# Altium PCB DSP_Expansion_Board.PcbDoc (part 3 of 3)
Units mil, origin at the board's own origin, x right, y up, seen from the top; angles counter-clockwise.
Board outline 7913.39 x 4448.82 mil, 4 copper layers (Top Layer, GND, inner signal, Bottom Layer), stack 23.78 mil thick; 392 components, 294 nets, 1167 pads, 457 vias.
Unrouted connection lines stored in the file: 108.
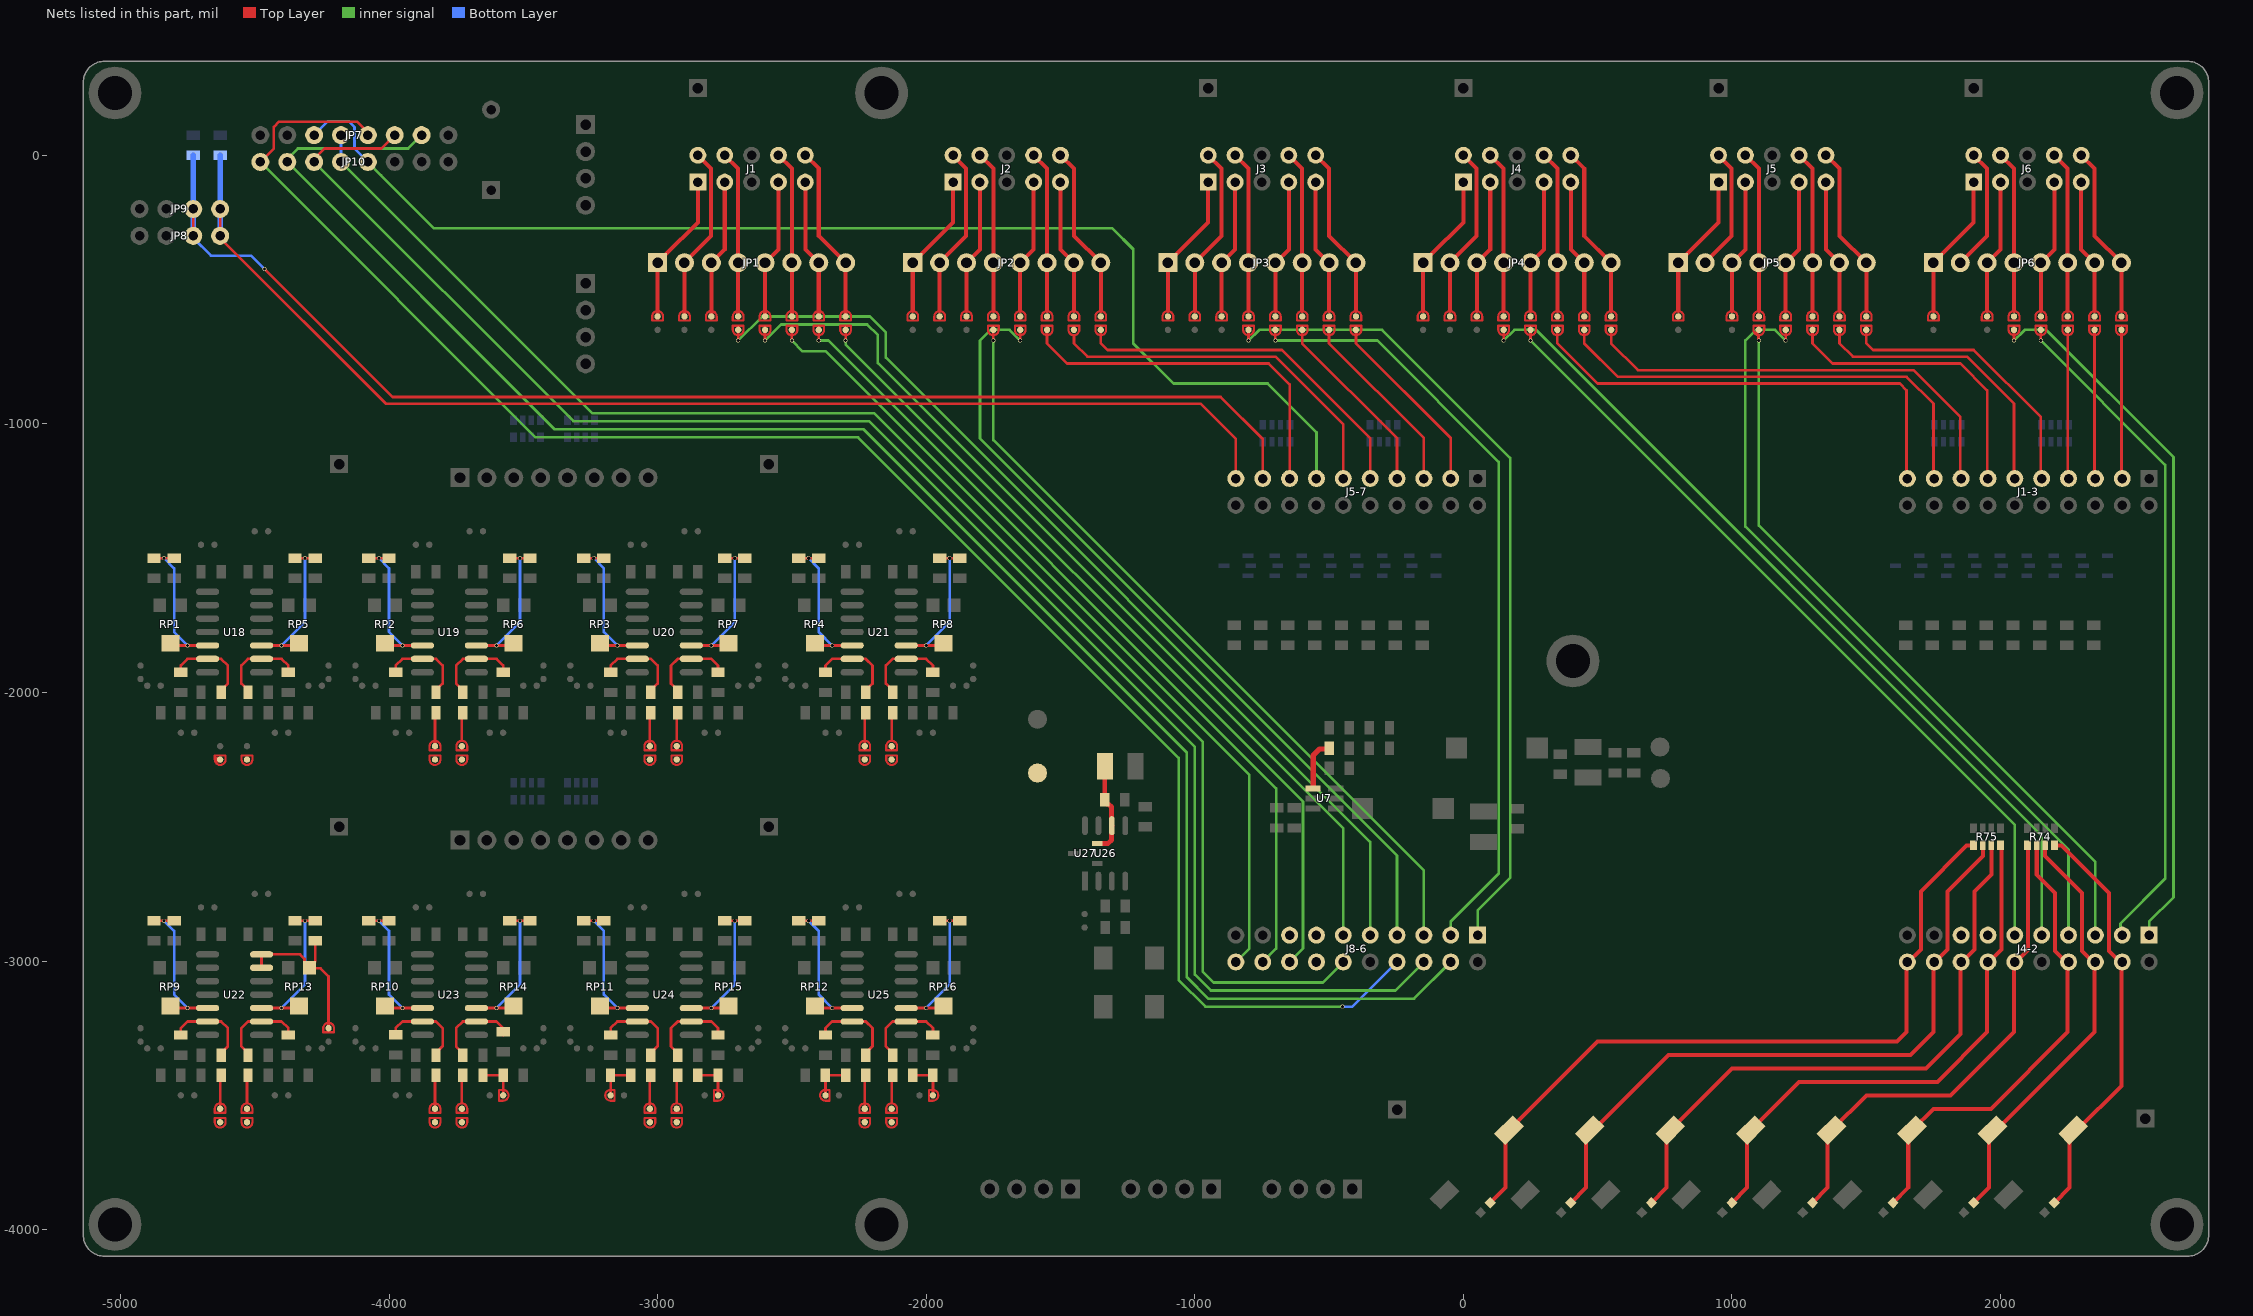
[diagram p5: the nets of this part, all layers, seen from the top]

## Via types
v1: diameter 15, hole 12, Top Layer to Bottom Layer, 457 vias

## Nets (pads, with @x,y where several pads share a name; then routed paths per layer and width w, separated by ;. In a path a pad name is that pad's centre, name@x,y a point inside that pad or via, vN(x,y) a via of type N, cw(c..) or ccw(c..) an arc to the next point about the centre after c; other vN are vias at no path point) (continued)
NetDE92_2: DE92.2 R59.2 R67.1 | length 150.2
  Top Layer w10: R67.1@-3650.2,-3425 R59.2@-3575,-3425 -3575,-3480 DE92.2@-3575,-3500
NetDE93_2: DE93.2 R60.2 R68.1 | length 150
  Top Layer w10: DE93.2@-3175,-3500 -3175,-3480 -3175,-3425 R68.1@-3100,-3425
NetDE94_2: DE94.2 R61.2 R69.1 | length 150.2
  Top Layer w10: R69.1@-2850.2,-3425 R61.2@-2775,-3425 -2775,-3480 DE94.2@-2775,-3500
NetDE95_2: DE95.2 R62.2 R70.1 | length 150
  Top Layer w10: DE95.2@-2375,-3500 -2375,-3480 -2375,-3425 R70.1@-2300,-3425
NetDE96_2: DE96.2 R63.2 R71.1 | length 150
  Top Layer w10: R71.1@-2050,-3425 R63.2@-1975,-3425 -1975,-3480 DE96.2@-1975,-3500
NetDE113_2: DE113.2 R99.2 RP13.1 U22.13 U22.14 | length 639.2
  Top Layer w10: U22.13@-4474.53,-3025 U22.14@-4474.53,-2975 -4331.6,-2975 -4314.79,-2991.81 -4314.79,-3006.47 -4294.25,-3027.01 -4254.79,-3027.01 -4225,-3056.8 -4225,-3230 DE113.2@-4225,-3250 ; RP13.1@-4294.25,-3021.02 -4275,-3001.77 R99.2@-4275,-2925
NetDE114_2: DE114.2 R34.2 | length 121.5
  Top Layer w10: DE114.2@-3828.74,-2200 R34.2@-3828.74,-2078.54
NetDE115_1: DE115.1 R35.2 | length 101.3
  Top Layer w10: -3728.74,-2180 R35.2@-3728.74,-2078.74
NetDE116_2: DE116.2 R36.2 | length 121.5
  Top Layer w10: DE116.2@-3028.74,-2200 R36.2@-3028.74,-2078.54
NetDE117_1: DE117.1 R37.2 | length 101.3
  Top Layer w10: -2928.74,-2180 R37.2@-2928.74,-2078.74
NetDE118_2: DE118.2 R38.2 | length 121.5
  Top Layer w10: DE118.2@-2228.74,-2200 R38.2@-2228.74,-2078.54
NetDE119_1: DE119.1 R39.2 | length 101.3
  Top Layer w10: -2128.74,-2180 R39.2@-2128.74,-2078.74
NetDE120_2: DE120.2 R64.2 | length 121.5
  Top Layer w10: DE120.2@-4628.74,-3550 R64.2@-4628.74,-3428.54
NetDE121_1: DE121.1 R65.2 | length 101.3
  Top Layer w10: -4528.74,-3530 R65.2@-4528.74,-3428.74
NetDE122_2: DE122.2 R66.2 | length 121.5
  Top Layer w10: DE122.2@-3828.74,-3550 R66.2@-3828.74,-3428.54
NetDE123_1: DE123.1 R67.2 | length 101.3
  Top Layer w10: -3728.74,-3530 R67.2@-3728.74,-3428.74
NetDE124_2: DE124.2 R68.2 | length 121.5
  Top Layer w10: DE124.2@-3028.74,-3550 R68.2@-3028.74,-3428.54
NetDE125_1: DE125.1 R69.2 | length 101.3
  Top Layer w10: -2928.74,-3530 R69.2@-2928.74,-3428.74
NetDE126_2: DE126.2 R70.2 | length 121.5
  Top Layer w10: DE126.2@-2228.74,-3550 R70.2@-2228.74,-3428.54
NetDE127_1: DE127.1 R71.2 | length 101.3
  Top Layer w10: -2128.74,-3530 R71.2@-2128.74,-3428.74
NetR2_1: R2.1 U7.1 | length 193.9
  Top Layer w20: U7.1@-559.65,-2357.28 -559.65,-2234.65 -535.59,-2210.59 -503.3,-2210.59 R2.1@-499.8,-2207.09
NetR8_1: R8.1 R16.1 U18.6 | length 331.3
  Top Layer w10: R16.1@-4775,-1925.2 -4775,-1900 -4750,-1875 U18.6@-4675.47,-1875 -4625,-1875 -4600,-1900 -4600,-1967.3 -4625.2,-1992.5 R8.1@-4625.2,-2000
NetR9_1: R9.1 R17.1 U18.9 | length 331.3
  Top Layer w10: R9.1@-4525,-2000 -4525,-1992.5 -4550,-1967.5 -4550,-1900 -4525,-1875 U18.9@-4474.53,-1875 -4400,-1875 -4375,-1900 R17.1@-4375,-1925.2
NetR10_1: R10.1 R18.1 U19.6 | length 331.3
  Top Layer w10: R18.1@-3975,-1925.2 -3975,-1900 -3950,-1875 U19.6@-3875.47,-1875 -3825,-1875 -3800,-1900 -3800,-1967.3 -3825.2,-1992.5 R10.1@-3825.2,-2000
NetR11_1: R11.1 R19.1 U19.9 | length 331.3
  Top Layer w10: R11.1@-3725,-2000 -3725,-1992.5 -3750,-1967.5 -3750,-1900 -3725,-1875 U19.9@-3674.53,-1875 -3600,-1875 -3575,-1900 R19.1@-3575,-1925.2
NetR12_1: R12.1 R20.1 U20.6 | length 331.3
  Top Layer w10: R20.1@-3175,-1925.2 -3175,-1900 -3150,-1875 U20.6@-3075.47,-1875 -3025,-1875 -3000,-1900 -3000,-1967.3 -3025.2,-1992.5 R12.1@-3025.2,-2000
NetR13_1: R13.1 R21.1 U20.9 | length 331.3
  Top Layer w10: R13.1@-2925,-2000 -2925,-1992.5 -2950,-1967.5 -2950,-1900 -2925,-1875 U20.9@-2874.53,-1875 -2800,-1875 -2775,-1900 R21.1@-2775,-1925.2
NetR14_1: R14.1 R22.1 U21.6 | length 331.3
  Top Layer w10: R22.1@-2375,-1925.2 -2375,-1900 -2350,-1875 U21.6@-2275.47,-1875 -2225,-1875 -2200,-1900 -2200,-1967.3 -2225.2,-1992.5 R14.1@-2225.2,-2000
NetR15_1: R15.1 R23.1 U21.9 | length 331.3
  Top Layer w10: R15.1@-2125,-2000 -2125,-1992.5 -2150,-1967.5 -2150,-1900 -2125,-1875 U21.9@-2074.53,-1875 -2000,-1875 -1975,-1900 R23.1@-1975,-1925.2
NetR40_1: R40.1 R48.1 U22.6 | length 331.3
  Top Layer w10: R48.1@-4775,-3275.2 -4775,-3250 -4750,-3225 U22.6@-4675.47,-3225 -4625,-3225 -4600,-3250 -4600,-3317.3 -4625.2,-3342.5 R40.1@-4625.2,-3350
NetR41_1: R41.1 R49.1 U22.9 | length 331.3
  Top Layer w10: R41.1@-4525,-3350 -4525,-3342.5 -4550,-3317.5 -4550,-3250 -4525,-3225 U22.9@-4474.53,-3225 -4400,-3225 -4375,-3250 R49.1@-4375,-3275.2
NetR42_1: R42.1 R50.1 U23.6 | length 331.3
  Top Layer w10: R50.1@-3975,-3275.2 -3975,-3250 -3950,-3225 U23.6@-3875.47,-3225 -3825,-3225 -3800,-3250 -3800,-3317.3 -3825.2,-3342.5 R42.1@-3825.2,-3350
NetR43_1: R43.1 R51.1 U23.9 | length 331.3
  Top Layer w10: R43.1@-3725,-3350 -3725,-3342.5 -3750,-3317.5 -3750,-3250 -3725,-3225 U23.9@-3674.53,-3225 -3600,-3225 -3575,-3250 R51.1@-3575,-3275.2
NetR44_1: R44.1 R52.1 U24.6 | length 331.3
  Top Layer w10: R52.1@-3175,-3275.2 -3175,-3250 -3150,-3225 U24.6@-3075.47,-3225 -3025,-3225 -3000,-3250 -3000,-3317.3 -3025.2,-3342.5 R44.1@-3025.2,-3350
NetR45_1: R45.1 R53.1 U24.9 | length 331.3
  Top Layer w10: R45.1@-2925,-3350 -2925,-3342.5 -2950,-3317.5 -2950,-3250 -2925,-3225 U24.9@-2874.53,-3225 -2800,-3225 -2775,-3250 R53.1@-2775,-3275.2
NetR46_1: R46.1 R54.1 U25.6 | length 331.3
  Top Layer w10: R54.1@-2375,-3275.2 -2375,-3250 -2350,-3225 U25.6@-2275.47,-3225 -2225,-3225 -2200,-3250 -2200,-3317.3 -2225.2,-3342.5 R46.1@-2225.2,-3350
NetR47_1: R47.1 R55.1 U25.9 | length 331.3
  Top Layer w10: R47.1@-2125,-3350 -2125,-3342.5 -2150,-3317.5 -2150,-3250 -2125,-3225 U25.9@-2074.53,-3225 -2000,-3225 -1975,-3250 R55.1@-1975,-3275.2
NetR80_1: R80.1 R81.2 RP1.2 U18.5 | length 578.4
  Top Layer w10: R80.1@-4875,-1500.2 v1(-4837.5,-1500.2) R81.2@-4800,-1500.2 ; RP1.2@-4814.37,-1816.73 -4806.1,-1825 U18.5@-4675.47,-1825
  Bottom Layer w10: v1(-4837.5,-1500.2) -4800,-1537.7 -4800,-1775 v1(-4750,-1825)
NetR82_2: R82.2 R83.1 RP5.2 U18.10 | length 578.4
  Top Layer w10: U18.10@-4474.53,-1825 -4343.9,-1825 RP5.2@-4335.63,-1816.73 ; R82.2@-4350,-1500.2 v1(-4312.5,-1500.2) R83.1@-4275,-1500.2
  Bottom Layer w10: v1(-4400,-1825) -4312.5,-1737.5 v1(-4312.5,-1500.2)
NetR84_1: R84.1 R85.2 RP2.2 U19.5 | length 578.4
  Top Layer w10: R84.1@-4075,-1500.2 v1(-4037.5,-1500.2) R85.2@-4000,-1500.2 ; RP2.2@-4014.37,-1816.73 -4006.1,-1825 U19.5@-3875.47,-1825
  Bottom Layer w10: v1(-4037.5,-1500.2) -4000,-1537.7 -4000,-1775 v1(-3950,-1825)
NetR86_2: R86.2 R87.1 RP6.2 U19.10 | length 578.4
  Top Layer w10: U19.10@-3674.53,-1825 -3543.9,-1825 RP6.2@-3535.63,-1816.73 ; R86.2@-3550,-1500.2 v1(-3512.5,-1500.2) R87.1@-3475,-1500.2
  Bottom Layer w10: v1(-3600,-1825) -3512.5,-1737.5 v1(-3512.5,-1500.2)
NetR88_1: R88.1 R89.2 RP3.2 U20.5 | length 578.4
  Top Layer w10: R88.1@-3275,-1500.2 v1(-3237.5,-1500.2) R89.2@-3200,-1500.2 ; RP3.2@-3214.37,-1816.73 -3206.1,-1825 U20.5@-3075.47,-1825
  Bottom Layer w10: v1(-3237.5,-1500.2) -3200,-1537.7 -3200,-1775 v1(-3150,-1825)
NetR90_2: R90.2 R91.1 RP7.2 U20.10 | length 578.4
  Top Layer w10: U20.10@-2874.53,-1825 -2743.9,-1825 RP7.2@-2735.63,-1816.73 ; R90.2@-2750,-1500.2 v1(-2712.5,-1500.2) R91.1@-2675,-1500.2
  Bottom Layer w10: v1(-2800,-1825) -2712.5,-1737.5 v1(-2712.5,-1500.2)
NetR92_1: R92.1 R93.2 RP4.2 U21.5 | length 578.4
  Top Layer w10: R92.1@-2475,-1500.2 v1(-2437.5,-1500.2) R93.2@-2400,-1500.2 ; RP4.2@-2414.37,-1816.73 -2406.1,-1825 U21.5@-2275.47,-1825
  Bottom Layer w10: v1(-2437.5,-1500.2) -2400,-1537.7 -2400,-1775 v1(-2350,-1825)
NetR94_2: R94.2 R95.1 RP8.2 U21.10 | length 578.4
  Top Layer w10: U21.10@-2074.53,-1825 -1943.9,-1825 RP8.2@-1935.63,-1816.73 ; R94.2@-1950,-1500.2 v1(-1912.5,-1500.2) R95.1@-1875,-1500.2
  Bottom Layer w10: v1(-2000,-1825) -1912.5,-1737.5 v1(-1912.5,-1500.2)
NetR96_1: R96.1 R97.2 RP9.2 U22.5 | length 578.4
  Top Layer w10: R96.1@-4875,-2850.2 v1(-4837.5,-2850.2) R97.2@-4800,-2850.2 ; RP9.2@-4814.37,-3166.73 -4806.1,-3175 v1(-4750,-3175) U22.5@-4675.47,-3175
  Bottom Layer w10: v1(-4837.5,-2850.2) -4800,-2887.7 -4800,-3125 v1(-4750,-3175)
NetR98_2: R98.2 R99.1 RP13.2 U22.10 | length 578.4
  Top Layer w10: U22.10@-4474.53,-3175 -4343.9,-3175 RP13.2@-4335.63,-3166.73 ; R98.2@-4350,-2850.2 v1(-4312.5,-2850.2) R99.1@-4275,-2850.2
  Bottom Layer w10: v1(-4400,-3175) -4312.5,-3087.5 v1(-4312.5,-2850.2)
NetR100_1: R100.1 R101.2 RP10.2 U23.5 | length 578.4
  Top Layer w10: R100.1@-4075,-2850.2 v1(-4037.5,-2850.2) R101.2@-4000,-2850.2 ; RP10.2@-4014.37,-3166.73 -4006.1,-3175 U23.5@-3875.47,-3175
  Bottom Layer w10: v1(-4037.5,-2850.2) -4000,-2887.7 -4000,-3125 v1(-3950,-3175)
NetR102_2: R102.2 R103.1 RP14.2 U23.10 | length 578.4
  Top Layer w10: U23.10@-3674.53,-3175 -3543.9,-3175 RP14.2@-3535.63,-3166.73 ; R102.2@-3550,-2850.2 v1(-3512.5,-2850.2) R103.1@-3475,-2850.2
  Bottom Layer w10: v1(-3600,-3175) -3512.5,-3087.5 v1(-3512.5,-2850.2)
NetR104_1: R104.1 R105.2 RP11.2 U24.5 | length 578.4
  Top Layer w10: R104.1@-3275,-2850.2 v1(-3237.5,-2850.2) R105.2@-3200,-2850.2 ; RP11.2@-3214.37,-3166.73 -3206.1,-3175 U24.5@-3075.47,-3175
  Bottom Layer w10: v1(-3237.5,-2850.2) -3200,-2887.7 -3200,-3125 v1(-3150,-3175)
NetR106_2: R106.2 R107.1 RP15.2 U24.10 | length 578.4
  Top Layer w10: U24.10@-2874.53,-3175 -2743.9,-3175 RP15.2@-2735.63,-3166.73 ; R106.2@-2750,-2850.2 v1(-2712.5,-2850.2) R107.1@-2675,-2850.2
  Bottom Layer w10: v1(-2800,-3175) -2712.5,-3087.5 v1(-2712.5,-2850.2)
NetR108_1: R108.1 R109.2 RP12.2 U25.5 | length 578.4
  Top Layer w10: R108.1@-2475,-2850.2 v1(-2437.5,-2850.2) R109.2@-2400,-2850.2 ; RP12.2@-2414.37,-3166.73 -2406.1,-3175 U25.5@-2275.47,-3175
  Bottom Layer w10: v1(-2437.5,-2850.2) -2400,-2887.7 -2400,-3125 v1(-2350,-3175)
NetR110_2: R110.2 R111.1 RP16.2 U25.10 | length 578.4
  Top Layer w10: U25.10@-2074.53,-3175 v1(-2000,-3175) -1943.9,-3175 RP16.2@-1935.63,-3166.73 ; R110.2@-1950,-2850.2 v1(-1912.5,-2850.2) R111.1@-1875,-2850.2
  Bottom Layer w10: v1(-2000,-3175) -1912.5,-3087.5 v1(-1912.5,-2850.2)
P0: DE24.1 J4-2.1 | length 2663.8
  Top Layer w10: v1(2050,-690) 2050,-670 DE24.1@2050,-650
  inner signal w10: v1(2050,-690) 2090,-650 2170,-650 2643.62,-1123.62 2643.62,-2762.93 2553,-2853.54 J4-2.1@2553,-2903.54
P1: DE30.1 J4-2.3 | length 2517.2
  Top Layer w10: v1(2150,-690) 2150,-670 DE30.1@2150,-650
  inner signal w10: v1(2150,-690) 2613,-1153 2613,-2693.54 2446.26,-2860.29 2446.26,-2896.8 J4-2.3@2453,-2903.54
P2: DE23.1 J4-2.5 | length 2766.7
  Top Layer w10: 1090,-660 1099.04,-669.04 1099.04,-669.98 1099.04,-689.04 v1(1100,-690)
  inner signal w10: v1(1100,-690) 1100,-1378.74 2353,-2631.74 J4-2.5@2353,-2903.54
P3: DE29.1 J4-2.7 | length 2935
  Top Layer w10: v1(1200,-690) 1200,-670 DE29.1@1200,-650
  inner signal w10: v1(1200,-690) 1160,-650 1090,-650 1050,-690 1050,-1382.02 2253,-2585.03 J4-2.7@2253,-2903.54
P4: DE22.1 J4-2.9 | length 3210.8
  Top Layer w10: v1(150,-690) 150,-670 DE22.1@150,-650
  inner signal w10: v1(150,-690) 190,-650 271.26,-650 2153,-2531.74 J4-2.9@2153,-2903.54
P5: DE28.1 J4-2.11 | length 3000.4
  Top Layer w10: v1(250,-690) 250,-670 DE28.1@250,-650
  inner signal w10: v1(250,-690) 2053,-2493 J4-2.11@2053,-2903.54
P6: DE21.1 J8-6.1 | length 3055.5
  Top Layer w10: v1(-800,-690) -800,-670 DE21.1@-800,-650
  inner signal w10: v1(-800,-690) -760,-650 -302.33,-650 174.36,-1126.68 174.36,-2690.07 53,-2811.42 J8-6.1@53,-2903.54
P7: DE27.1 J8-6.3 | length 2894.2
  Top Layer w10: v1(-700,-690) -700,-670 DE27.1@-700,-650
  inner signal w10: v1(-700,-690) -320.54,-690 131.54,-1142.08 131.54,-2675.01 -47,-2853.54 J8-6.3@-47,-2903.54
P8: DE20.1 J8-6.5 | length 2917.5
  Top Layer w10: v1(-1750,-690) -1750,-670 DE20.1@-1750,-650
  inner signal w10: v1(-1750,-690) -1750,-1060.54 -147,-2663.54 J8-6.5@-147,-2903.54
P9: DE26.1 J8-6.7 | length 3080
  Top Layer w10: v1(-1650,-690) -1650,-670 DE26.1@-1650,-650
  inner signal w10: v1(-1650,-690) -1690,-650 -1760,-650 -1800,-690 -1800,-1053.74 -247,-2606.74 J8-6.7@-247,-2903.54
P10: DE19.1 J8-6.9 | length 3642.5
  Top Layer w10: v1(-2700,-690) -2700,-670 DE19.1@-2700,-650
  inner signal w10: v1(-2700,-690) -2610,-600 -2210,-600 -2150,-660 -2150,-753.74 -347,-2556.74 J8-6.9@-347,-2903.54
P11: DE25.1 J8-6.11 | length 3452.8
  Top Layer w10: v1(-2600,-690) -2600,-670 DE25.1@-2600,-650
  inner signal w10: v1(-2600,-690) -2540,-630 -2220,-630 -2180,-670 -2180,-773.74 -447,-2506.74 J8-6.11@-447,-2903.54
P14: J8-6.13
P15: J8-6.15
P16: J4-2.15
P18: DE36.1 J1-3.7 | length 554.8
  Top Layer w10: DE36.1@2250,-650 2250,-670 2250,-1200.54 J1-3.7@2253,-1203.54
P19: DE42.1 J1-3.5 | length 554.8
  Top Layer w10: DE42.1@2350,-650 2350,-670 2350,-1200.54 J1-3.5@2353,-1203.54
P22: DE46.1 J1-3.15 | length 1693.7
  Top Layer w10: DE46.1@550,-650 550,-670 550,-700 650,-800 1675,-800 1850,-975 1850,-1200.54 J1-3.15@1853,-1203.54
P24: J4-2.13
P25: DE31.1 J8-6.20 | length 3130.2
  Top Layer w10: v1(-2500,-690) -2500,-670 DE31.1@-2500,-650
  inner signal w10: v1(-2500,-690) -2460,-730 -2373.74,-730 -797,-2306.74 -797,-2953.54 J8-6.20@-847,-3003.54
P26: DE43.1 J8-6.16 | length 3079.7
  Top Layer w10: v1(-2300,-689.37) -2300,-670 DE43.1@-2300,-650
  inner signal w10: v1(-2300,-689.37) -2300,-703.74 -597,-2406.74 -597,-2953.54 J8-6.16@-647,-3003.54
P27: DE37.1 J8-6.18 | length 3100.9
  Top Layer w10: v1(-2400,-690) -2400,-670 DE37.1@-2400,-650
  inner signal w10: v1(-2400,-690) -2363.82,-690 -697,-2356.83 -697,-2953.54 J8-6.18@-747,-3003.54
P29: C18.1 J4-2.20 R75.5 SW1.1 | length 2744
  Top Layer w15: C18.1@100,-3900 156.29,-3843.71 156.29,-3643.71 SW1.1@170.21,-3629.79 500,-3300 1614.42,-3300 1650,-3264.42 1650,-3050 1650,-3010.04 1703,-2957.03 1703,-2740.3 1872.7,-2570.6 1896.92,-2570.6 R75.5@1899.21,-2568.3
P32: DE48.1 J1-3.3 | length 554.8
  Top Layer w10: DE48.1@2450,-650 2450,-670 2450,-1200.54 J1-3.3@2453,-1203.54
P40: J5-7.19 JP8.4 JP9.4 R73.1 | length 4649.2
  Top Layer w10: JP9.4@-4628.74,-200 -4628.74,-308.41 -4012.15,-925 -978.74,-925 -847,-1056.74 J5-7.19@-847,-1205.79
  Bottom Layer w20: JP8.4@-4628.74,-300 JP9.4@-4628.74,-200 R73.1@-4628.74,0
P41: J5-7.17 JP8.3 JP9.3 R72.1 | length 4864
  Top Layer w10: JP8.3@-4728.74,-308.41 JP9.3@-4728.74,-200 ; v1(-4463.33,-423.82) -3987.15,-900 -903.74,-900 -747,-1056.74 J5-7.17@-747,-1212.21
  Bottom Layer w10: JP8.3@-4728.74,-300 -4728.74,-308.41 -4663.33,-373.82 -4513.33,-373.82 v1(-4463.33,-423.82)
  Bottom Layer w20: JP8.3@-4728.74,-300 JP9.3@-4728.74,-200 R72.1@-4728.74,0
P52: DE32.1 J5-7.15 | length 1373.6
  Top Layer w10: DE32.1@-1550,-650 -1550,-670 -1550,-700 -1475,-775 -725,-775 -647,-853 J5-7.15@-647,-1210.18
P56: DE33.1 J5-7.7 | length 700.4
  Top Layer w10: DE33.1@-600,-650 -600,-670 -600,-700 -247,-1053 J5-7.7@-247,-1204.22
P58: C17.1 J4-2.12 R74.5 SW5.1 | length 1829.2
  Top Layer w15: C17.1@1300,-3900 1356.29,-3843.71 SW5.1@1356.29,-3643.71 ; SW5.1@1370.21,-3629.79 1500,-3500 1814.42,-3500 2050,-3264.42 2050,-3050 2050,-3010.04 2102,-2958.04 2102,-2570.3 R74.5@2100,-2568.3
P59: C12.1 J4-2.14 R75.8 SW4.1 | length 2030.1
  Top Layer w15: C12.1@1000,-3900 1056.29,-3843.71 SW4.1@1056.29,-3643.71 ; SW4.1@1070.21,-3629.79 1250,-3450 1764.42,-3450 1950,-3264.42 1950,-3050 1950,-3010.04 2003,-2957.03 2003,-2571.3 R75.8@2000,-2568.3
P60: DE35.1 J1-3.13 | length 1102.3
  Top Layer w10: DE35.1@1300,-650 1300,-670 1300,-700 1375,-775 1850,-775 1950,-875 1950,-1200.54 J1-3.13@1953,-1203.54
P61: C11.1 J4-2.4 R74.8 SW8.1 | length 1541.4
  Top Layer w15: C11.1@2200,-3900 2256.29,-3843.71 SW8.1@2256.29,-3643.71 ; R74.8@2200.79,-2568.3 2203.08,-2570.6 2227.3,-2570.6 2403,-2746.3 2403,-2963.04 2450,-3010.04 2450,-3464.42 2284.63,-3629.79 SW8.1@2270.21,-3629.79
P63: J8-6.12 JP7.4 JP10.4 | length 5630.4
  inner signal w10: JP10.4@-4178.74,-25 -3243.74,-960 -2193.74,-960 -970,-2183.74 -970,-3040 -930,-3080 -523.45,-3080 J8-6.12@-447,-3003.54
  Bottom Layer w10: JP10.4@-4178.74,-25 JP7.4@-4178.74,75
P64: J8-6.14
P65: J5-7.13 JP7.3 JP10.5 | length 4655.5
  inner signal w10: JP10.5@-4078.74,-25 -4078.74,-25.3 -4029.04,-75 -3831.94,-272.1 -1306.94,-272.1 -1229.04,-350 -1229.04,-700 -1079.04,-850 -728.74,-850 -547,-1031.74 J5-7.13@-547,-1203.54
  Bottom Layer w10: JP7.3@-4278.74,75 -4228.74,125 -4148.74,125 -4128.74,105 -4128.74,25 JP10.5@-4078.74,-25
P66: J8-6.4 JP7.7 JP10.2 | length 6726.1
  inner signal w10: JP7.7@-3878.74,85 JP7.7@-3878.74,75 -3928.74,25 -4339.52,25 -4378.74,-14.22 JP10.2@-4378.74,-25 -3383.74,-1020 -2233.74,-1020 -1030,-2223.74 -1030,-3060 -950,-3140 -183.45,-3140 J8-6.4@-47,-3003.54
P67: DE47.1 J1-3.9 | length 1043.7
  Top Layer w10: DE47.1@1500,-650 1500,-670 1500,-700 1525,-725 1900,-725 2150,-975 2150,-1200.54 J1-3.9@2153,-1203.54
P94: DE38.1 J5-7.11 | length 1354.8
  Top Layer w10: -1450,-674.25 -1450,-700 -1400,-750 -700,-750 -447,-1003 J5-7.11@-447,-1203.54
P95: DE45.1 J5-7.3 | length 700.4
  Top Layer w10: DE45.1@-400,-650 -400,-670 -400,-700 -47,-1053 J5-7.3@-47,-1204.22
P97: DE44.1 J5-7.9 | length 1350.4
  Top Layer w10: DE44.1@-1350,-650 -1350,-670 -1350,-700 -1325,-725 -675,-725 -347,-1053 J5-7.9@-347,-1204.22
P104: DE34.1 J1-3.19 | length 1752.3
  Top Layer w10: DE34.1@350,-650 350,-670 350,-700 500,-850 650,-850 1625,-850 1650,-875 1650,-1200.54 J1-3.19@1653,-1203.54
P105: DE40.1 J1-3.17 | length 1723
  Top Layer w10: DE40.1@450,-650 450,-670 450,-700 575,-825 650,-825 1650,-825 1750,-925 1750,-1200.54 J1-3.17@1753,-1203.54
P111: DE41.1 J1-3.11 | length 1073
  Top Layer w10: DE41.1@1400,-650 1400,-670 1400,-700 1450,-750 1875,-750 2050,-925 2050,-1200.54 J1-3.11@2053,-1203.54
P122: C15.1 J4-2.8 R74.6 SW6.1 | length 1754.6
  Top Layer w15: C15.1@1600,-3900 1656.29,-3843.71 SW6.1@1656.29,-3643.71 ; SW6.1@1670.21,-3629.79 1750,-3550 1964.42,-3550 2250,-3264.42 2250,-3050 2250,-3010.04 2203,-2963.04 2203,-2746.3 2134.65,-2677.95 R74.6@2134.65,-2568.3
P123: C13.1 J4-2.6 R74.7 SW7.1 | length 1583
  Top Layer w15: C13.1@1900,-3900 1956.29,-3843.71 SW7.1@1956.29,-3643.71 ; SW7.1@1970.21,-3629.79 1984.63,-3629.79 2350,-3264.42 2350,-3050 2350,-3010.04 2303,-2963.04 2303,-2746.3 2166.14,-2609.44 R74.7@2166.14,-2568.3
P124: C14.1 J4-2.16 R75.7 SW3.1 | length 2259
  Top Layer w15: C14.1@700,-3900 756.29,-3843.71 SW3.1@756.29,-3643.71 ; SW3.1@770.21,-3629.79 1000,-3400 1721.87,-3400 1850,-3271.87 1850,-3050 1850,-3010.04 1903,-2957.03 1903,-2740.3 1965.35,-2677.95 R75.7@1965.35,-2568.3
P125: C16.1 J4-2.18 R75.6 SW2.1 | length 2483
  Top Layer w15: C16.1@400,-3900 456.29,-3843.71 SW2.1@456.29,-3643.71 ; SW2.1@470.21,-3629.79 484.63,-3629.79 764.42,-3350 1664.42,-3350 1750,-3264.42 1750,-3050 1750,-3010.04 1803,-2957.03 1803,-2740.3 1933.86,-2609.44 R75.6@1933.86,-2568.3
P130: J8-6.8 JP7.5 JP10.1 | length 6628.7
  Top Layer w10: JP10.1@-4478.74,-25 -4428.74,25 -4428.74,105 -4408.74,125 -4118.74,125 -4078.74,85 JP7.5@-4078.74,75 ; JP7.5@-4092.34,77.03 JP7.5@-4092.34,82.74
  inner signal w10: JP10.1@-4478.74,-25 -3453.74,-1050 -2253.74,-1050 -1060,-2243.74 -1060,-3070 -960,-3170 v1(-450,-3170)
  Bottom Layer w10: v1(-450,-3170) -413.45,-3170 J8-6.8@-247,-3003.54
P131: J8-6.6 JP7.6 JP10.3 | length 6297.1
  Top Layer w10: JP10.3@-4278.74,-25 -4278.74,-14.22 -4239.52,25 -4028.74,25 JP7.6@-3978.74,75
  inner signal w10: JP10.3@-4278.74,-25 -3313.74,-990 -2213.74,-990 -1000,-2203.74 -1000,-3050 -940,-3110 -253.45,-3110 J8-6.6@-147,-3003.54
P139: DE39.1 J5-7.5 | length 700.4
  Top Layer w10: DE39.1@-500,-650 -500,-670 -500,-700 -147,-1053 J5-7.5@-147,-1204.22
UD1.1: DE1.2 J1.1 JP1.1 | length 562.1
  Top Layer w15: DE1.2@-3000,-600 -3000,-580 JP1.1@-3000,-400 -2972.07,-372.07 -2850,-250 J1.1@-2850,-100
UD1.2: DE7.2 J1.2 JP1.2 | length 661.3
  Top Layer w15: DE7.2@-2900,-600 -2900,-580 JP1.2@-2900,-400 -2801,-301 -2801,-49 J1.2@-2850,0
UD1.3: DE13.2 J1.3 JP1.3 | length 520.7
  Top Layer w15: DE13.2@-2800,-600 -2800,-580 JP1.3@-2800,-400 -2750,-350 J1.3@-2750,-100
UD1.4: DE19.2 J1.4 JP1.4 | length 620.7
  Top Layer w15: J1.4@-2750,0 -2700,-50 JP1.4@-2700,-400 -2700,-580 DE19.2@-2700,-600
UD1.5: DE25.2 J1.7 JP1.5 | length 520.7
  Top Layer w15: DE25.2@-2600,-600 -2600,-580 JP1.5@-2600,-400 -2550,-350 J1.7@-2550,-100
UD1.6: DE31.2 J1.8 JP1.6 | length 620.7
  Top Layer w15: J1.8@-2550,0 -2500,-50 JP1.6@-2500,-400 -2500,-580 DE31.2@-2500,-600
UD1.7: DE37.2 J1.9 JP1.7 | length 520.7
  Top Layer w15: J1.9@-2450,-100 -2450,-350 JP1.7@-2400,-400 -2400,-580 DE37.2@-2400,-600
UD1.8: DE43.2 J1.10 JP1.8 | length 662.1
  Top Layer w15: J1.10@-2450,0 -2400,-50 -2400,-300 JP1.8@-2300,-400 -2300,-580 DE43.2@-2300,-600
UD2.1: DE2.2 J2.1 JP2.1 | length 542.1
  Top Layer w15: -2050,-580 JP2.1@-2050,-400 -2022.07,-372.07 -1900,-250 J2.1@-1900,-100
UD2.2: DE8.2 J2.2 JP2.2 | length 641.3
  Top Layer w15: -1950,-580 JP2.2@-1950,-400 -1851,-301 -1851,-49 J2.2@-1900,0
UD2.3: DE14.2 J2.3 JP2.3 | length 500.7
  Top Layer w15: -1850,-580 JP2.3@-1850,-400 -1800,-350 J2.3@-1800,-100
UD2.4: DE20.2 J2.4 JP2.4 | length 600.7
  Top Layer w15: J2.4@-1800,0 -1750,-50 JP2.4@-1750,-400 -1750,-580
UD2.5: DE26.2 J2.7 JP2.5 | length 500.7
  Top Layer w15: -1650,-580 JP2.5@-1650,-400 -1600,-350 J2.7@-1600,-100
UD2.6: DE32.2 J2.8 JP2.6 | length 600.7
  Top Layer w15: J2.8@-1600,0 -1550,-50 JP2.6@-1550,-400 -1550,-580
UD2.7: DE38.2 J2.9 JP2.7 | length 500.7
  Top Layer w15: J2.9@-1500,-100 -1500,-350 JP2.7@-1450,-400 -1450,-580
UD2.8: DE44.2 J2.10 JP2.8 | length 642.1
  Top Layer w15: J2.10@-1500,0 -1450,-50 -1450,-300 JP2.8@-1350,-400 -1350,-580
UD3.1: DE3.2 J3.1 JP3.1 | length 542.1
  Top Layer w15: -1100,-580 JP3.1@-1100,-400 -1072.07,-372.07 -950,-250 J3.1@-950,-100
UD3.2: DE9.2 J3.2 JP3.2 | length 641.3
  Top Layer w15: -1000,-580 JP3.2@-1000,-400 -901,-301 -901,-49 J3.2@-950,0
UD3.3: DE15.2 J3.3 JP3.3 | length 500.7
  Top Layer w15: -900,-580 JP3.3@-900,-400 -850,-350 J3.3@-850,-100
UD3.4: DE21.2 J3.4 JP3.4 | length 600.7
  Top Layer w15: J3.4@-850,0 -800,-50 JP3.4@-800,-400 -800,-580
UD3.5: DE27.2 J3.7 JP3.5 | length 500.7
  Top Layer w15: -700,-580 JP3.5@-700,-400 -650,-350 J3.7@-650,-100
UD3.6: DE33.2 J3.8 JP3.6 | length 600.7
  Top Layer w15: J3.8@-650,0 -600,-50 JP3.6@-600,-400 -600,-580
UD3.7: DE39.2 J3.9 JP3.7 | length 500.7
  Top Layer w15: J3.9@-550,-100 -550,-350 JP3.7@-500,-400 -500,-580
UD3.8: DE45.2 J3.10 JP3.8 | length 642.1
  Top Layer w15: J3.10@-550,0 -500,-50 -500,-300 JP3.8@-400,-400 -400,-580
UD4.1: DE4.2 J4.1 JP4.1 | length 542.1
  Top Layer w15: -150,-580 JP4.1@-150,-400 -122.07,-372.07 0,-250 J4.1@0,-100
UD4.2: DE10.2 J4.2 JP4.2 | length 641.3
  Top Layer w15: -50,-580 JP4.2@-50,-400 49,-301 49,-49 J4.2@0,0
UD4.3: DE16.2 J4.3 JP4.3 | length 500.7
  Top Layer w15: 50,-580 JP4.3@50,-400 100,-350 J4.3@100,-100
UD4.4: DE22.2 J4.4 JP4.4 | length 600.7
  Top Layer w15: J4.4@100,0 150,-50 JP4.4@150,-400 150,-580
UD4.5: DE28.2 J4.7 JP4.5 | length 500.7
  Top Layer w15: 250,-580 JP4.5@250,-400 300,-350 J4.7@300,-100
UD4.6: DE34.2 J4.8 JP4.6 | length 600.7
  Top Layer w15: J4.8@300,0 350,-50 JP4.6@350,-400 350,-580
UD4.7: DE40.2 J4.9 JP4.7 | length 500.7
  Top Layer w15: J4.9@400,-100 400,-350 JP4.7@450,-400 450,-580
UD4.8: DE46.2 J4.10 JP4.8 | length 642.1
  Top Layer w15: J4.10@400,0 450,-50 450,-300 JP4.8@550,-400 550,-580
UD5.1: DE5.2 J5.1 JP5.1 | length 542.1
  Top Layer w15: 800,-580 JP5.1@800,-400 827.93,-372.07 950,-250 J5.1@950,-100
UD5.2: J5.2 JP5.2 | length 461.3
  Top Layer w15: JP5.2@900,-400 999,-301 999,-49 J5.2@950,0
UD5.3: DE17.2 J5.3 JP5.3 | length 500.7
  Top Layer w15: 1000,-580 JP5.3@1000,-400 1050,-350 J5.3@1050,-100
UD5.4: DE23.2 J5.4 JP5.4 | length 600.7
  Top Layer w15: J5.4@1050,0 1100,-50 JP5.4@1100,-400 1100,-580
UD5.5: DE29.2 J5.7 JP5.5 | length 500.7
  Top Layer w15: 1200,-580 JP5.5@1200,-400 1250,-350 J5.7@1250,-100
UD5.6: DE35.2 J5.8 JP5.6 | length 600.7
  Top Layer w15: J5.8@1250,0 1300,-50 JP5.6@1300,-400 1300,-580
UD5.7: DE41.2 J5.9 JP5.7 | length 500.7
  Top Layer w15: J5.9@1350,-100 1350,-350 JP5.7@1400,-400 1400,-580
UD5.8: DE47.2 J5.10 JP5.8 | length 642.1
  Top Layer w15: J5.10@1350,0 1400,-50 1400,-300 JP5.8@1500,-400 1500,-580
UD6.1: DE6.2 J6.1 JP6.1 | length 542.1
  Top Layer w15: 1750,-580 JP6.1@1750,-400 1777.93,-372.07 1900,-250 J6.1@1900,-100
UD6.2: J6.2 JP6.2 | length 461.3
  Top Layer w15: JP6.2@1850,-400 1949,-301 1949,-49 J6.2@1900,0
UD6.3: DE18.2 J6.3 JP6.3 | length 500.7
  Top Layer w15: 1950,-580 JP6.3@1950,-400 2000,-350 J6.3@2000,-100
UD6.4: DE24.2 J6.4 JP6.4 | length 600.7
  Top Layer w15: J6.4@2000,0 2050,-50 JP6.4@2050,-400 2050,-580
UD6.5: DE30.2 J6.7 JP6.5 | length 500.7
  Top Layer w15: 2150,-580 JP6.5@2150,-400 2200,-350 J6.7@2200,-100
UD6.6: DE36.2 J6.8 JP6.6 | length 600.7
  Top Layer w15: J6.8@2200,0 2250,-50 JP6.6@2250,-400 2250,-580
UD6.7: DE42.2 J6.9 JP6.7 | length 500.7
  Top Layer w15: J6.9@2300,-100 2300,-350 JP6.7@2350,-400 2350,-580
UD6.8: DE48.2 J6.10 JP6.8 | length 642.1
  Top Layer w15: J6.10@2300,0 2350,-50 2350,-300 JP6.8@2450,-400 2450,-580
VREF: C40.2 C41.2 DE11.1 DE12.2 DE114.1 DE115.2 DE116.1 DE117.2 DE118.1 DE119.2 DE120.1 DE121.2 DE122.1 DE123.2 DE124.1 DE125.2 DE126.1 DE127.2 U26.6 U27.2 VREF.1 | length 364.7
  Top Layer w18: U27.2@-1362.64,-2562.01 -1322.01,-2562.01 -1310,-2550 -1310,-2497.24 U26.6@-1308.82,-2496.06 -1309.52,-2495.36 -1309.52,-2468.17 -1310,-2467.69 -1310,-2426.54 -1320.54,-2416 -1326.5,-2416 -1335,-2407.5 C40.2@-1335,-2400 C41.2@-1335,-2275
  Top Layer w20: -4642.02,-2250 DE11.1@-4628.74,-2250 ; DE124.1@-3028.74,-3600 -3027.56,-3598.82 -3027.23,-3599.14 -3028.09,-3600 DE124.1@-3028.74,-3600
pads on no net: J1-3.2 J4-2.10 J5-7.2 J8-6.10 U26.1 U26.3 U26.7 U26.8

## Polygon pours and split planes (outlines as drawn)
VREF on Top Layer "NONET_L02_P-001" (solid, remove dead copper, pour order 43): -1941.59,-2225.01 -1975.58,-2259 -1329.58,-2259 -1349.58,-2239 -1349.58,-2225.01
GND on Top Layer "NONET_L02_P-001" (hatched Horizontal grid 20 track 20, remove dead copper, pour order 35): 2656.94,74.41 cw(c2656.94,231.89) 2499.46,231.89 2499.46,389.37 2814.42,389.37 2814.42,-4138.19 2499.46,-4138.19 2499.46,-3980.71 cw(c2656.94,-3980.71) 2656.94,-3823.23
GND on Top Layer "NONET_L02_P-001" (hatched Horizontal grid 20 track 20, remove dead copper, pour order 41): -4862.74,-3980.71 ccw(c-5020.22,-3980.71) -5020.22,-3823.23 -5177.7,-3823.23 -5177.7,-4138.19 -650.15,-4138.19 -650.15,-3980.71 -965.11,-3980.71
GND on Top Layer "NONET_L02_P-001" (hatched Horizontal grid 20 track 20, remove dead copper, pour order 37): -5020.22,74.41 ccw(c-5020.22,231.89) -4862.74,231.89 -4862.74,389.37 -5177.7,389.37 -5177.7,-4138.19 -4862.74,-4138.19 -4862.74,-3980.71 ccw(c-5020.22,-3980.71) -5020.22,-3823.23
GND on Top Layer "NONET_L02_P-001" (hatched Horizontal grid 20 track 20, remove dead copper, pour order 40): 2499.46,-3980.71 cw(c2656.94,-3980.71) 2656.94,-3823.23 2814.42,-3823.23 2814.42,-4138.19 -1713.14,-4138.19 -1713.14,-3980.71 -1398.18,-3980.71
GND on Top Layer "NONET_L02_P-001" (hatched Horizontal grid 20 track 20, remove dead copper, pour order 38): 2499.46,231.89 ccw(c2656.94,231.89) 2656.94,74.41 2814.42,74.41 2814.42,389.37 -1713.14,389.37 -1713.14,231.89 -1398.18,231.89
GND on Top Layer "NONET_L02_P-001" (hatched Horizontal grid 20 track 20, remove dead copper, pour order 39): -4862.74,231.89 cw(c-5020.22,231.89) -5020.22,74.41 -5177.7,74.41 -5177.7,389.37 -650.15,389.37 -650.15,231.89 -965.11,231.89
VREF on Top Layer "NONET_L02_P-001" (solid, remove dead copper, pour order 22): -1735.58,-3600 -1885.58,-3750 -4667.42,-3750 -4692.42,-3725 -4692.42,-3628.01 -4660.58,-3600
GND on Top Layer "NONET_L02_P-001" (solid, remove dead copper, pour order 21): -503.53,-2430 -503.54,-2442.94 -503.53,-2504.79 -521.24,-2522.5 -513.74,-2530 -418.74,-2530 -446.46,-2502.28 -446.46,-2432.28 -448.74,-2430
GND on Top Layer "NONET_L02_P-001" (solid, remove dead copper, pour order 16): 1621.26,-1800 1596.26,-1825 1596.26,-1875 1621.26,-1900 2371.26,-1900 2396.26,-1875 2396.26,-1825 2371.26,-1800
GND on Top Layer "NONET_L02_P-001" (solid, remove dead copper, pour order 15): -878.74,-1800 -903.74,-1825 -903.74,-1875 -878.74,-1900 -128.74,-1900 -103.74,-1875 -103.74,-1825 -128.74,-1800
VREF on Top Layer "NONET_L02_P-001" (solid, remove dead copper, pour order 14): -1305.08,-2261.67 -1305.08,-2425 -1533.74,-2425
VREF on Top Layer "NONET_L02_P-001" (solid, remove dead copper, pour order 13): -1982.16,-3653.42 -1885.58,-3750 -1810.58,-3750 -1528.74,-3450 -1528.74,-2500 -1328.74,-2300 -1878.74,-2300 -1977.58,-2398.84 -1728.74,-2647.67 -1728.74,-3400
VREF on Top Layer "NONET_L02_P-001" (solid, remove dead copper, pour order 11): -1803.74,-2250 -1853.74,-2300 -1853.74,-2325 -1353.74,-2325 -1353.74,-2250
VREF on Top Layer "NONET_L02_P-001" (solid, remove dead copper, pour order 9): -1728.74,-2250 -1878.74,-2400 -4660.58,-2400 -4685.58,-2375 -4685.58,-2278.01 -4653.74,-2250
GND on Top Layer "NONET_L02_P-001" (solid, remove dead copper, pour order 8): -1228.74,-2250 -1278.74,-2322.05 -1278.74,-2424.26 -1260.57,-2442.43 -1128.74,-2442.43 -1128.74,-2300 -1178.74,-2250 -1209.48,-2250
NetC2_2 on Top Layer "NONET_L02_P-001" (solid, pour order 5): -443.82,-2306.18 -420,-2330 -420,-2370 -438.33,-2388.33 -438.33,-2401.67 -400,-2440 -370,-2440 -335.63,-2405.63 -335.63,-2294.37 -372.88,-2257.12 -442.53,-2257.12 -443.83,-2258.42
GND on Top Layer "NONET_L02_P-001" (solid, remove dead copper, pour order 4): 330,-2280 290,-2320 290,-2440 240,-2490 160,-2490 130,-2520 -570,-2520 -600,-2490 -720,-2490 -730,-2500 -730,-2580 -720,-2590 524.42,-2590 774.42,-2340 774.42,-2290 764.42,-2280
3V3 on Top Layer "NONET_L02_P-001" (solid, remove dead copper, pour order 3): 210,-2230 230,-2250 764.42,-2250 809.42,-2205 764.42,-2160 210,-2160
NetC1_2 on Top Layer "NONET_L02_P-001" (solid, remove dead copper, pour order 1): -125,-2475 -150,-2450 -150,-2400 -300,-2250 -300,-2100 -275,-2075 -25,-2075 75,-2175 75,-2250 200,-2375 225,-2400 225,-2450 150,-2450 125,-2475
no net on Top Layer "NONET_L02_P-001" (solid, remove dead copper, pour order 26): 2656.94,-43.7 2655.57,-42.33 2655.57,73.04
no net on Top Layer "NONET_L02_P-001" (solid, remove dead copper, pour order 25): 2655.57,73.04
no net on Top Layer "NONET_L02_P-001" (solid, remove dead copper, pour order 18): -503.74,-2420
no net on Top Layer "NONET_L02_P-001" (solid, remove dead copper, pour order 17): -503.74,-2430
GND on Bottom Layer "NONET_L02_P-001" (hatched Horizontal grid 20 track 20, remove dead copper, pour order 33): -4862.74,-3980.71 ccw(c-5020.22,-3980.71) -5020.22,-3823.23 -5177.7,-3823.23 -5177.7,-4138.19 -650.15,-4138.19 -650.15,-3980.71 -965.11,-3980.71
GND on Bottom Layer "NONET_L02_P-001" (hatched Horizontal grid 20 track 20, remove dead copper, pour order 29): -5020.22,74.41 ccw(c-5020.22,231.89) -4862.74,231.89 -4862.74,389.37 -5177.7,389.37 -5177.7,-4138.19 -4862.74,-4138.19 -4862.74,-3980.71 ccw(c-5020.22,-3980.71) -5020.22,-3823.23
GND on Bottom Layer "NONET_L02_P-001" (hatched Horizontal grid 20 track 20, remove dead copper, pour order 32): 2499.46,-3980.71 cw(c2656.94,-3980.71) 2656.94,-3823.23 2814.42,-3823.23 2814.42,-4138.19 -1713.14,-4138.19 -1713.14,-3980.71 -1398.18,-3980.71
GND on Bottom Layer "NONET_L02_P-001" (hatched Horizontal grid 20 track 20, remove dead copper, pour order 31): -4862.74,231.89 cw(c-5020.22,231.89) -5020.22,74.41 -5177.7,74.41 -5177.7,389.37 -650.15,389.37 -650.15,231.89 -965.11,231.89
GND on Bottom Layer "NONET_L02_P-001" (hatched Horizontal grid 20 track 20, remove dead copper, pour order 30): 2499.46,231.89 ccw(c2656.94,231.89) 2656.94,74.41 2814.42,74.41 2814.42,389.37 -1713.14,389.37 -1713.14,231.89 -1398.18,231.89
GND on Bottom Layer "NONET_L02_P-001" (hatched Horizontal grid 20 track 20, remove dead copper, pour order 27): 2656.94,74.41 cw(c2656.94,231.89) 2499.46,231.89 2499.46,389.37 2814.42,389.37 2814.42,-4138.19 2499.46,-4138.19 2499.46,-3980.71 cw(c2656.94,-3980.71) 2656.94,-3823.23
GND on GND "NONET_L02_P-001" (hatched Horizontal grid 20 track 20, remove dead copper, pour order 7): -5300,-5500 -4950,-5850 3000,-5850 3200,-5650 3100,-5550 3100,1500 -4750,1500 -5750,500

## Keep-outs
Keep-Out Layer:
  lines w5: -1511.93,-2599.41 cw(c-1456.93,-2599.41) -1456.93,-2544.41 -1416.93,-2544.41 cw(c-1416.93,-2554.41) -1406.93,-2554.41 cw(c-1416.93,-2554.41) -1416.93,-2564.41 -1456.93,-2564.41 ccw(c-1456.93,-2599.41) -1491.93,-2599.41 ccw(c-1456.93,-2599.41) -1456.93,-2634.41 -1416.93,-2634.41 cw(c-1416.93,-2644.41) -1406.93,-2644.41 cw(c-1416.93,-2644.41) -1416.93,-2654.41 -1456.93,-2654.41 cw(c-1456.93,-2599.41) -1511.93,-2599.41
  lines w10: -5138.33,-4020.08 ccw(c-5059.59,-4020.08) -5059.59,-4098.82 2499.46,-4098.82 2696.31,-4098.82 ccw(c2696.31,-4020.08) 2775.05,-4020.08 2775.05,271.26 ccw(c2696.31,271.26) 2696.31,350 2656.94,350 -5059.59,350 ccw(c-5059.59,271.26) -5138.33,271.26 -5138.33,-4020.08

## Silkscreen, mask and mechanical layers (free items; w line width, h text height)
Top Overlay:
  text "GND" at -4461.91,161.46 h70 r90
  text "VCC" at -4361.91,161.46 h70 r90
  text "CLK" at -4261.91,161.46 h70 r90
  text "SDA" at -4161.91,161.46 h70 r90
  text "RES" at -4061.91,161.46 h70 r90
  text "DC" at -3961.91,161.46 h70 r90
  text "CS" at -3861.91,161.46 h70 r90
  text "BL" at -3761.91,161.46 h70 r90
  text "P41" at -4708.74,40 h70 r90
  text "P40" at -4608.74,40 h70 r90
  text "BL_ON" at -3476.36,-69.11 h60 r90
  text "GND" at -4909.87,-131.76 h70 r90
  text "VCC" at -4809.87,-131.76 h70 r90
  text "CLK" at -4709.87,-131.76 h70 r90
  text "SDA" at -4609.87,-131.76 h70 r90
  text "RES" at -4459.32,-234.32 h70 r90
  text "CS" at -4359.32,-234.32 h70 r90
  text "DC" at -4259.32,-234.32 h70 r90
  text "SDA" at -4159.32,-234.32 h70 r90
  text "CLK" at -4059.32,-234.32 h70 r90
  text "VCC" at -3959.32,-234.32 h70 r90
  text "BL" at -3859.32,-234.32 h70 r90
  text "GND" at -3759.32,-234.32 h70 r90
  text "P130" at -4458.74,-410 h70 r90
  text "P66" at -4358.74,-410 h70 r90
  text "P131" at -4258.74,-410 h70 r90
  text "P63" at -4158.74,-410 h70 r90
  text "P65" at -4058.74,-410 h70 r90
  text "GND" at -4809.74,-508 h70 r90
  text "CLK" at -4711.91,-508.54 h70 r90
  text "SDA" at -4611.91,-508.54 h70 r90
  text "VCC" at -4911.09,-510.31 h70 r90
  text "P25" at -2485.58,-845 h70 r90
  text "P27" at -2385.58,-845 h70 r90
  text "P26" at -2285.58,-845 h70 r90
  text "P52" at -1535.58,-845 h70 r90
  text "P94" at -1435.58,-845 h70 r90
  text "P97" at -1335.58,-845 h70 r90
  text "P56" at -585.58,-845 h70 r90
  text "P139" at -485.58,-845 h70 r90
  text "P95" at -385.58,-845 h70 r90
  text "P104" at 364.42,-845 h70 r90
  text "P105" at 464.42,-845 h70 r90
  text "P22" at 564.42,-845 h70 r90
  text "P60" at 1314.42,-845 h70 r90
  text "P111" at 1414.42,-845 h70 r90
  text "P67" at 1514.42,-845 h70 r90
  text "P18" at 2264.42,-845 h70 r90
  text "P19" at 2364.42,-845 h70 r90
  text "P32" at 2464.42,-845 h70 r90
  text "ADCA4" at -2985.58,-920 h70 r90
  text "ADCA1" at -2885.58,-920 h70 r90
  text "ADCB4" at -2785.58,-920 h70 r90
  text "P10/6A" at -2685.58,-920 h70 r90
  text "P11/6B" at -2585.58,-920 h70 r90
  text "ADCC4" at -2035.58,-920 h70 r90
  text "ADCC3" at -1935.58,-920 h70 r90
  text "ADCA5" at -1835.58,-920 h70 r90
  text "P8/5A" at -1735.58,-920 h70 r90
  text "P9/5B" at -1635.58,-920 h70 r90
  text "ADCB5" at -1085.58,-920 h70 r90
  text "ADCB3" at -985.58,-920 h70 r90
  text "ADCC5" at -885.58,-920 h70 r90
  text "P6/4A" at -785.58,-920 h70 r90
  text "P7/4B" at -685.58,-920 h70 r90
  text "ADCA2" at -135.58,-920 h70 r90
  text "ADCA0" at -35.58,-920 h70 r90
  text "ADCB2" at 64.42,-920 h70 r90
  text "P4/3A" at 164.42,-920 h70 r90
  text "P5/3B" at 264.42,-920 h70 r90
  text "ADCC2" at 814.42,-920 h70 r90
  text "ADCA3" at 1014.42,-920 h70 r90
  text "P2/2A" at 1114.42,-920 h70 r90
  text "P3/2B" at 1214.42,-920 h70 r90
  text "ADCB3" at 1764.42,-920 h70 r90
  text "ADCC3" at 1964.42,-920 h70 r90
  text "P0/1A" at 2064.42,-920 h70 r90
  text "P1/1B" at 2164.42,-920 h70 r90
  text "*" at -985.58,-950 h70 r90
  text "*" at -1935.58,-970 h70 r90
  text "3V3" at 68.94,-1132.77 h50 r90
  text "3V3" at 2567.96,-1136.67 h50 r90
  text "-12" at -4850,-1410 h50
  text "+12" at -4850,-1460 h50
  text "GND" at -29.25,-1468.08 h50 r90
  text "GND" at 2470.75,-1468.08 h50 r90
  text "A1" at -4785.58,-2250 h70
  text "A4" at -4435.58,-2250 h70
  text "B4" at -3985.58,-2250 h70
  text "C4" at -3635.58,-2250 h70
  text "A5" at -3185.58,-2250 h70
  text "B5" at -2835.58,-2250 h70
  text "C5" at -2385.58,-2250 h70
  text "15" at -2035.58,-2250 h70
  text "-12" at -4850,-2760 h50
  text "+12" at -4850,-2810 h50
  text "GND" at 70.75,-3168.08 h50 r90
  text "GND" at 2570.75,-3168.08 h50 r90
  text "P29" at 39.42,-3425 h80
  text "P125" at 339.42,-3425 h80
  text "P124" at 639.42,-3425 h80
  text "P59" at 964.42,-3425 h80
  text "P58" at 1264.42,-3425 h80
  text "P122" at 1564.42,-3425 h80
  text "P123" at 1864.42,-3425 h80
  text "P61" at 2164.42,-3425 h80
  text "A0" at -4785.58,-3600 h70
  text "A2" at -4435.58,-3600 h70
  text "B2" at -3985.58,-3600 h70
  text "C2" at -3635.58,-3600 h70
  text "A3" at -3185.58,-3600 h70
  text "B3" at -2835.58,-3600 h70
  text "C3" at -2385.58,-3600 h70
  text "14" at -2035.58,-3600 h70
  text "-12V" at -1209.65,-3679.92 h60 r90
  text "GND" at -1109.65,-3679.92 h60 r90
  text "+5V" at -1009.65,-3679.92 h60 r90
  text "+12V" at -909.65,-3679.92 h60 r90
Bottom Overlay:
  text "TMS320F28379D_DSP_Expansion_Board_2021.8.5" at -2647,-3903.54 h80
Mechanical 1:
  lines w5: -5140.84,-4020.08 ccw(c-5059.59,-4020.08) -5059.59,-4101.32 2696.31,-4101.32 ccw(c2696.31,-4020.08) 2777.55,-4020.08 2777.55,271.26 ccw(c2696.31,271.26) 2696.31,352.5 -5059.59,352.5 ccw(c-5059.59,271.26) -5140.84,271.26 -5140.84,-4020.08 ; -1511.93,-2599.41 ccw(c-1456.93,-2599.41) -1456.93,-2654.41 -1416.93,-2654.41 ccw(c-1416.93,-2644.41) -1406.93,-2644.41 ccw(c-1416.93,-2644.41) -1416.93,-2634.41 -1456.93,-2634.41 cw(c-1456.93,-2599.41) -1491.93,-2599.41 cw(c-1456.93,-2599.41) -1456.93,-2564.41 -1416.93,-2564.41 ccw(c-1416.93,-2554.41) -1406.93,-2554.41 ccw(c-1416.93,-2554.41) -1416.93,-2544.41 -1456.93,-2544.41 ccw(c-1456.93,-2599.41) -1511.93,-2599.41

## Text inside footprints (layer, text, board x,y; h text height)
J1: Top Overlay "2" at -3110,-20 h40; Top Overlay "1" at -3100,-120 h40; Top Overlay "9" at -2238,-128 h40; Top Overlay "10" at -2238,-28 h40
J2: Top Overlay "2" at -2160,-20 h40; Top Overlay "1" at -2150,-120 h40; Top Overlay "9" at -1288,-128 h40; Top Overlay "10" at -1288,-28 h40
J3: Top Overlay "2" at -1210,-20 h40; Top Overlay "1" at -1200,-120 h40; Top Overlay "9" at -338,-128 h40; Top Overlay "10" at -338,-28 h40
J4: Top Overlay "2" at -260,-20 h40; Top Overlay "1" at -250,-120 h40; Top Overlay "9" at 612,-128 h40; Top Overlay "10" at 612,-28 h40
J5: Top Overlay "2" at 690,-20 h40; Top Overlay "1" at 700,-120 h40; Top Overlay "9" at 1562,-128 h40; Top Overlay "10" at 1562,-28 h40
J6: Top Overlay "2" at 1640,-20 h40; Top Overlay "1" at 1650,-120 h40; Top Overlay "9" at 2512,-128 h40; Top Overlay "10" at 2512,-28 h40
SW9: Top Overlay "ON" at -3660,90 h60